# Altium PCB zulu_a7_fab_b.PcbDoc (part 5 of 5)
Units mm, origin at the board's own origin, x right, y up, seen from the top; angles counter-clockwise.
Board outline 69.85 x 25.4 mm, 6 copper layers (Top Layer, L2-GND, L3-SIG, L4-SIG, L5-VCC3V3, Bottom Layer), stack 1.65 mm thick; 203 components, 197 nets, 896 pads, 2025 vias.
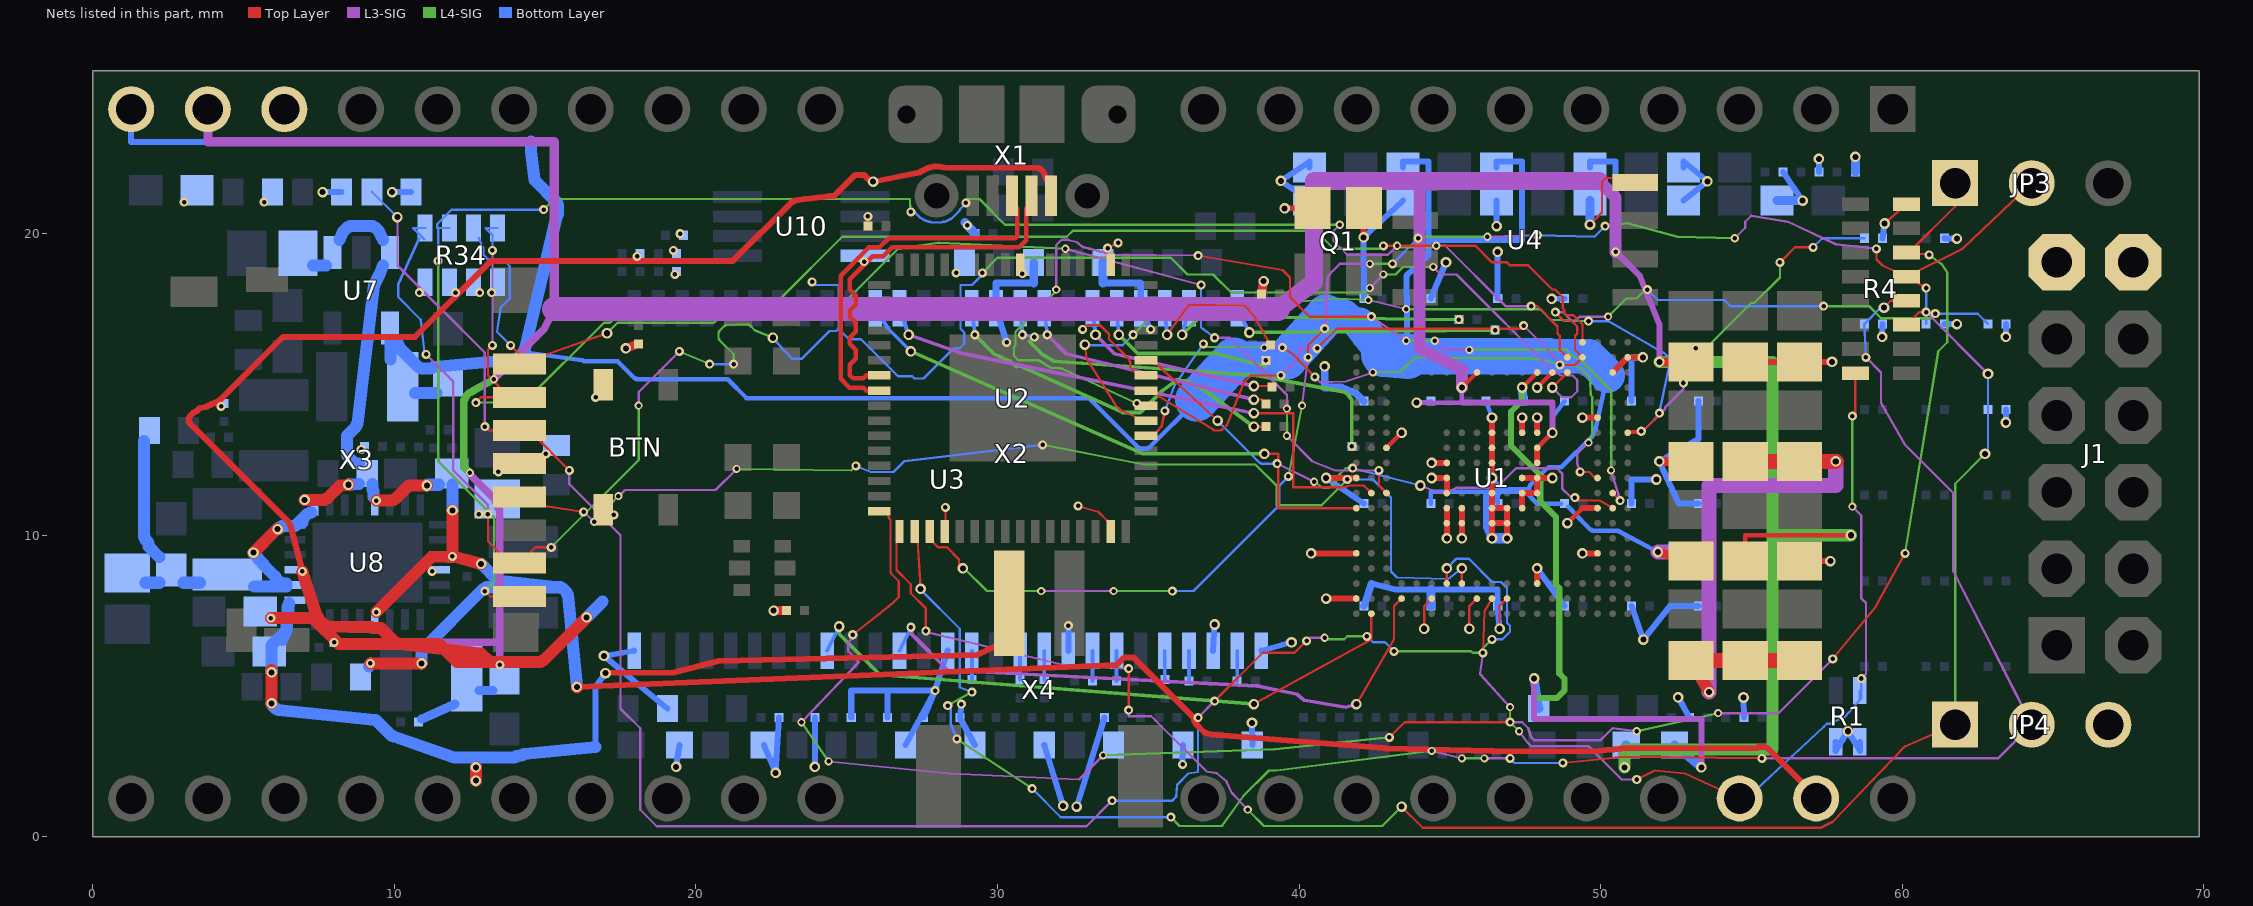
[diagram p8: the nets of this part, all layers, seen from the top]

## Via types
v1: diameter 0.27, hole 0.15, L3-SIG to L4-SIG, tented both sides, 403 vias
v2: diameter 0.3, hole 0.15, Top Layer to L2-GND, tented both sides, 344 vias
v3: diameter 0.3, hole 0.15, L5-VCC3V3 to Bottom Layer, tented both sides, 330 vias
v4: diameter 0.35, hole 0.2, Top Layer to Bottom Layer, tented both sides, 329 vias
v5: diameter 0.3, hole 0.15, L4-SIG to L5-VCC3V3, tented both sides, 312 vias
v6: diameter 0.3, hole 0.15, L2-GND to L3-SIG, tented both sides, 307 vias

## Nets (pads, with @x,y where several pads share a name; then routed paths per layer and width w, separated by ;. In a path a pad name is that pad's centre, name@x,y a point inside that pad or via, vN(x,y) a via of type N, cw(c..) or ccw(c..) an arc to the next point about the centre after c; other vN are vias at no path point) (continued)
RST#: R1.2 R4.16 U1.V10 X2.23 | length 29.3
  Top Layer w0.076: v2(46.1,6.1) 46.15,7.475 U1.V10@46.4,7.9 ; v2(51.2,1.9) 51.8,2.2 52.8,2.1 X2.23@54.61,1.27 ; v2(58.35,13.95) 58.45,14.05 R4.16@58.45,15.378
  L3-SIG w0.076: v2(46.1,6.1) 46,5.4 v1(47,4.3) ; v1(47.3,3.5) 47.6,3.1 47.7,3 49.6,3 50.7,1.9 v2(51.2,1.9) ; v1(58.35,10.95) 58.65,10.65 58.65,7.9 58.8,7.75 58.8,5.4 v1(58.65,5.25)
  L4-SIG w0.076: v1(47,4.3) 47,3.8 v1(47.3,3.5) ; v1(58.35,10.95) v2(58.35,13.95)
  Bottom Layer w0.076: X2.23@55.15,1.55 57.4,3.65 57.5,3.75 57.625,3.75 57.65,3.775 58.1,3.975 R1.2@58.6,4.55 ; R1.2@58.6,4.85 R1.2@58.6,4.55 ; v1(58.65,5.25) 58.65,4.6 R1.2@58.6,4.55
  other v1: 58.35,13.95
  other v3: 58.65,5.25
  other v5: 58.65,5.25
  other v6: 51.2,1.9 46.1,6.1 58.35,13.95
SD-CLK: U1.U8 X3.5 | length 36.5
  Top Layer w0.076: X3.5@14.825,11 v2(16.275,10.775) ; U1.U8@45.4,8.4 v4(45.4,8.9)
  L3-SIG w0.076: v2(16.275,10.775) v1(16.625,10.45) ; v1(17.425,11.3) 17.45,11.3 17.65,11.5 20.65,11.5 v1(21.35,12.2)
  L4-SIG w0.076: v1(16.625,10.45) v1(17.425,11.3) ; v1(21.35,12.2) 25.15,12.15 v5(25.3,12.3) ; v5(31.5,13) 34.85,12.35 38.55,12.35 39.25,11.65 39.25,11 40.75,11 v5(41.6,11.85)
  Bottom Layer w0.076: v5(25.3,12.3) 25.8,12.1 26.55,12.1 26.9,12.45 v5(31.5,13) ; v5(41.6,11.85) 42.45,11.85 43.05,11.25 43.05,8.8 43.25,8.6 44.95,8.55 v4(45.4,8.9)
  other v3: 41.6,11.85 25.3,12.3 31.5,13
  other v6: 16.275,10.775
SD-CMD: R35.1 U1.U7 X3.3 | length 63
  Top Layer w0.076: v2(13,13.6) 13.125,13.475 X3.3@14.15,13.475 14.475,13.475 v2(15.8,12.15) ; v2(37.2,4.5) 38.8,6.1 39.85,6.1 v2(40.25,6.5) ; U1.U7@44.9,8.4 v4(44.9,8.9)
  L3-SIG w0.076: v4(10.1,20.55) 10.1,18.95 13,16.05 v2(13,13.6) ; v2(15.8,12.15) 15.8,11.7 17.5,10 17.5,4.25 18.15,3.6 18.15,0.9 18.7,0.35 32.95,0.35 v1(33.8,1.2) ; v1(36.65,3.95) v2(37.2,4.5) ; v2(40.25,6.5) 40.35,6.6 v1(40.85,6.6)
  L4-SIG w0.076: v1(40.85,6.6) 40.9,6.55 41.5,6.55 41.6,6.65 v5(42.25,6.65) ; v5(43.15,6.15) 45.7,6.15 45.75,6.1 45.95,6.1 v5(46.4,6.55)
  Bottom Layer w0.076: R35.1@9.25,21.39 v4(10.1,20.55) ; v1(33.8,1.2) 35.8,1.2 35.932,1.332 35.95,1.72 36.327,2.097 36.65,2.152 v1(36.65,3.95) ; v5(42.25,6.65) 42.45,6.45 42.85,6.45 v5(43.15,6.15) ; v4(44.9,8.9) 45.225,9.225 45.625,9.225 46.4,8.45 46.7,8.45 46.9,8.25 46.9,7.1 47,7 47,6.8 46.75,6.55 v5(46.4,6.55)
  other v3: 33.8,1.2 36.65,3.95 43.15,6.15 46.4,6.55 42.25,6.65
  other v5: 33.8,1.2 36.65,3.95
  other v6: 37.2,4.5 40.25,6.5 15.8,12.15 13,13.6
SD-DAT0: R34.1 U1.C15 X3.7 | length 66.4
  Top Layer w0.076: v2(13.1,10.7) 13.1,9.8 13.825,9.075 X3.7@14.15,9.075 14.675,9.6 v2(15.2,9.6) ; v4(48.4,14.9) U1.C15@48.9,15.4
  L3-SIG w0.076: v1(11.05,16) 11.95,15.1 11.95,12.15 13.1,11 v2(13.1,10.7) ; v1(18.1,14.3) 18.1,14.75 v6(19.45,16.1) ; v1(42.35,18.2) v1(42.8,18.65) ; v1(44.45,18.9) 44.7,18.65 45.225,18.65 48.5,15.375 48.6,15.375 48.675,15.3 49.075,15.3 49.225,15.15 49.225,14.775 49.025,14.575 48.725,14.575 v4(48.4,14.9)
  L4-SIG w0.076: v2(15.2,9.6) 18.1,12.5 v1(18.1,14.3) ; v6(19.45,16.1) v5(20.45,15.675) ; v5(21.25,15.675) 21.25,16 20.775,16.475 20.775,16.5 20.75,16.525 20.75,16.725 20.775,16.75 20.775,16.775 20.95,16.95 20.975,16.95 21,16.975 21.725,17 21.75,16.975 21.775,16.975 21.95,16.8 v4(22.55,16.55) ; v5(29.5,18.7) 30,19.2 35.75,19.2 36.3,18.65 37.15,18.65 37.75,18.05 42.2,18.05 v1(42.35,18.2) ; v1(42.8,18.65) 43.2,18.65 43.45,18.9 v1(44.45,18.9)
  Bottom Layer w0.076: R34.1@10.825,19.85 10.125,18.325 10.125,17.9 10.875,17.15 11,16.05 v1(11.05,16) ; R34.1@11,19.81 10.62,20.19 R34.1@11.02,20.19 ; v5(20.45,15.675) v5(21.25,15.675) ; v4(22.55,16.55) 22.925,16.125 23.2,15.85 23.5,15.85 24.425,16.775 24.65,16.775 24.725,16.85 ; v3(23.85,18.4) 23.95,18.3 24.725,18.3 24.725,16.85 ; v5(29.5,18.7) 29.5,18.65 29.15,18.3 28.775,18.3 28.775,16.85 28.9,16.725 28.9,16.35 28.75,16.2 28.575,16.2 28.55,16.175 28.525,16.175 27.55,15.2 27.25,15.2 27.175,15.275 26.7,15.275 25.475,16.5 25.075,16.5 24.725,16.85
  other v1: 15.2,9.6 19.45,16.1
  other v3: 20.45,15.675 21.25,15.675 11.05,16 29.5,18.7
  other v5: 11.05,16
  other v6: 15.2,9.6 13.1,10.7
SD-DAT1: R34.2 U1.B15 X3.8 | length 57
  Top Layer w0.076: v2(13,8.15) 13.175,7.975 X3.8@14.15,7.975 ; v2(47.7,17.6) 47.9,17.6 48.575,16.925 48.575,16.688 48.65,16.612 48.65,16.15 U1.B15@48.9,15.9
  L3-SIG w0.076: v1(41.35,20.3) 41.15,20.1 41.15,19.75 41.6,19.3 42.95,19.3 v1(43.25,19.6) ; v1(44.55,19.6) 44.85,19.6 46.85,17.6 v2(47.7,17.6)
  L4-SIG w0.076: v5(11.45,19.1) 11.45,12.45 13.3,10.6 13.3,8.45 v2(13,8.15) ; v5(14.95,20.8) 15.3,21.15 27.1,21.15 27.1,21.05 v5(27.125,20.725) ; v5(28.95,21.025) 28.95,21.15 29.4,21.15 30.25,20.3 v1(41.35,20.3) ; v1(43.25,19.6) 43.3,19.55 44.5,19.55 v1(44.55,19.6)
  Bottom Layer w0.076: v5(11.45,19.1) 11.45,20.16 11.42,20.19 ; R34.2@11.82,20.19 11.42,20.19 ; v5(14.95,20.8) 11.9,20.8 11.42,20.32 11.42,20.19 ; v5(27.125,20.725) 27.25,20.725 27.45,20.525 27.475,20.525 27.525,20.475 27.55,20.475 27.575,20.45 27.6,20.45 27.625,20.425 27.675,20.425 27.7,20.4 27.775,20.4 27.8,20.375 28.15,20.375 28.175,20.4 28.275,20.4 28.3,20.425 28.325,20.425 28.35,20.45 28.375,20.45 28.4,20.475 28.425,20.475 28.45,20.5 28.475,20.5 28.75,20.775 28.75,20.8 28.775,20.825 v5(28.95,21.025)
  other v1: 13,8.15
  other v3: 11.45,19.1 27.125,20.725 14.95,20.8 28.95,21.025
  other v6: 13,8.15 47.7,17.6
SD-DAT2: R34.3 U1.L3 X3.1 | length 40.2
  Top Layer w0.076: v2(13.85,16.3) 14.15,16 X3.1@14.15,15.675 v4(17.05,16.7) ; v2(42.65,12.15) 42.65,11.65 U1.L3@42.9,11.4
  L3-SIG w0.076: v1(32.25,19.5) v1(36.75,18.3) ; v1(37.2,16.55) 37.7,16.55 39.6,14.65 v1(39.6,14.2) ; v1(39.6,13.3) 40.45,12.45 41.2,12.15 v2(42.65,12.15)
  L4-SIG w0.076: v4(17.05,16.7) 17.4,17.05 20.6,17.05 20.95,17.4 24.6,17.4 26.7,19.5 28.05,19.7 v1(32.25,19.5) ; v1(39.6,13.3) v1(39.6,14.2)
  Bottom Layer w0.076: R34.3@12.8,19.85 12.925,19.55 12.95,19.525 12.95,19.3 13.1,19.15 13.6,19.15 13.825,18.925 13.825,17.85 13.525,17.55 13.4,16.75 v2(13.85,16.3) ; v1(36.75,18.3) 36.75,16.9 36.8,16.85 v1(37.2,16.55)
  other v1: 13.85,16.3
  other v3: 13.85,16.3 37.2,16.55 36.75,18.3
  other v5: 13.85,16.3 37.2,16.55 36.75,18.3
  other v6: 42.65,12.15 13.85,16.3
SD-DAT3: R34.4 U1.A16 X3.2 | length 49.3
  Top Layer w0.076: v2(12.7,14.4) 12.875,14.575 X3.2@13.825,14.575 ; v2(13.25,16.3) 13.1,16.15 13.1,15.3 X3.2@13.825,14.575 ; X3.2@14.15,14.575 X3.2@13.825,14.575 ; v2(42.8,19.6) 45.85,19.6 46.4,19.05 46.9,19.05 47,18.95 47.6,18.95 48.4,18.15 48.5,18.15 48.75,17.9 48.75,17.525 48.8,17.475 48.8,17.375 48.875,17.3 49.1,17.3 49.4,17 U1.A16@49.4,16.4
  L3-SIG w0.076: v2(13.25,16.3) v1(13.25,19.45)
  L4-SIG w0.076: v2(12.7,14.4) 14.3,14.4 16.95,17.05 17.15,17.05 17.4,17.3 20.1,17.3 20.65,17.85 22.8,17.85 24.85,19.9 32.3,19.9 32.5,20.1 40.55,20.1 41.15,19.5 42.7,19.5 v2(42.8,19.6)
  Bottom Layer w0.076: v1(13.25,19.45) 13.25,19.96 13.02,20.19 R34.4@13.42,20.19
  other v1: 12.7,14.4 42.8,19.6
  other v3: 13.25,19.45
  other v5: 13.25,19.45
  other v6: 12.7,14.4 13.25,16.3 42.8,19.6
SDRAM-CLK: U1.M1 U3.38 | length 19.2
  Top Layer w0.076: v4(38.85,12.7) 39.312,12.7 39.312,10.9 40.9,10.9 41.5,10.9 U1.M1@41.9,10.9
  L4-SIG w0.125: v4(27.125,16.1) 34.825,12.7 v4(38.85,12.7)
  Bottom Layer w0.125: U3.38@25.95,17.53 26.375,16.85 v4(27.125,16.1)
SDRAM-CS#: U1.W2 U3.19 | length 20.8
  Top Layer w0.076: v4(38.5,4.4) 42.4,6.55 U1.W2@42.4,7.4
  L4-SIG w0.125: v4(24.75,6.975) 24.75,6.725 26.1,5.375 v4(38.5,4.4)
  Bottom Layer w0.125: U3.19@24.35,6.17 v4(24.75,6.975)
SDRAM-D0: R119.1 U3.2 | length 1
  Bottom Layer w0.125: R119.1@37.95,5.17 U3.2@37.95,6.17
SDRAM-D1: R120.1 U3.4 | length 1
  Bottom Layer w0.125: R120.1@36.35,5.17 U3.4@36.35,6.17
SDRAM-D2: R121.1 U3.5 | length 1
  Bottom Layer w0.125: R121.1@35.55,5.21 U3.5@35.55,6.17
SDRAM-D3: R122.1 U3.7 | length 1
  Bottom Layer w0.125: R122.1@33.95,5.17 U3.7@33.95,6.17
SDRAM-D4: R123.1 U3.8 | length 1
  Bottom Layer w0.125: R123.1@33.15,5.17 U3.8@33.15,6.17
SDRAM-D5: R124.1 U3.10 | length 1
  Bottom Layer w0.125: R124.1@31.55,5.21 U3.10@31.55,6.17
SDRAM-D6: R125.1 U3.11 | length 1
  Bottom Layer w0.125: R125.1@30.75,5.21 U3.11@30.75,6.17
SDRAM-D7: R126.1 U3.13 | length 1
  Bottom Layer w0.125: R126.1@29.15,5.21 U3.13@29.15,6.17
SDRAM-D8: R127.1 U3.42 | length 12.2
  Top Layer w0.076: v4(38.5,13.6) R127.1@38.9,13.6
  L4-SIG w0.12: 30.625,15.6 30.825,15.6 30.85,15.575
  L4-SIG w0.125: v3(29.25,16.65) 29.875,16.025 30.4,15.775 30.425,15.775 30.575,15.625 30.6,15.625 30.625,15.6 ; 30.85,15.575 34.15,14.075 34.725,14.075 34.75,14.1 34.775,14.1 35.475,14.8 35.95,15.15 36.225,15.125 36.25,15.1 36.3,15.1 36.35,15.075 36.375,15.05 36.4,15.05 36.45,15.025 36.475,15 36.5,15 36.55,14.975 36.575,14.95 36.6,14.95 36.65,14.925 36.675,14.9 36.7,14.9 36.725,14.875 36.75,14.875 36.775,14.85 36.8,14.85 36.85,14.825 v4(38.5,13.6)
  Bottom Layer w0.125: U3.42@29.15,17.53 v3(29.25,16.65)
  other v5: 29.25,16.65
SDRAM-D9: R128.1 U3.44 | length 14.2
  L4-SIG w0.125: v3(31.225,16.575) 31.05,16.425 31.45,16.025 31.875,15.775 38.6,15.3 41.5,14.75 41.6,14.7 41.75,14.5 41.75,13.275 v3(41.75,12.95)
  Bottom Layer w0.125: U3.44@30.75,17.53 v3(30.825,16.65) v3(31.225,16.575)
  other v5: 41.75,12.95 31.225,16.575
SDRAM-D10: R129.1 U3.45 | length 8.6
  Top Layer w0.076: v4(38.5,14.5) 38.77,14.5 R129.1@38.91,14.36
  L3-SIG w0.125: v3(31.65,16.65) 32.275,16.025 v4(38.5,14.5)
  Bottom Layer w0.125: U3.45@31.55,17.53 v3(31.65,16.65)
  other v1: 31.65,16.65
  other v5: 31.65,16.65
SDRAM-D11: R130.1 U3.47 | length 7.1
  Top Layer w0.076: v4(38.5,14.95) 39.1,14.95 R130.1@39.1,14.92
  L3-SIG w0.125: v4(33.25,16.65) 33.875,16.025 v4(38.5,14.95)
  Bottom Layer w0.125: U3.47@33.15,17.53 v4(33.25,16.65)
SDRAM-D12: R131.1 U3.48 | length 6.2
  L4-SIG w0.125: v4(34.025,16.65) 34.65,16.025 37.25,16.025 38.854,15.619 v1(38.9,15.8)
  Bottom Layer w0.125: U3.48@33.95,17.53 v4(34.025,16.65)
  other v2: 38.9,15.8
  other v6: 38.9,15.8
SDRAM-D13: R132.1 U3.50 | length 5.5
  Top Layer w0.076: v4(35.625,16.65) 36.345,17.64 38.185,17.62 38.505,17.28 R132.1@39.05,16.304
  Bottom Layer w0.125: U3.50@35.55,17.53 v4(35.625,16.65)
SDRAM-D14: R133.1 U3.51 | length 10.3
  L4-SIG w0.125: v4(36.125,16.65) 36.725,17.25 38,17.25 v5(45.3,17.15)
  Bottom Layer w0.125: v4(36.125,16.65) U3.51@36.35,17.53
  other v3: 45.3,17.15
SDRAM-D15: R134.1 U3.53 | length 9
  L4-SIG w0.125: v4(38.35,16.725) v5(46.5,16.8)
  Bottom Layer w0.125: U3.53@37.95,17.53 v4(38.35,16.725)
  other v3: 46.5,16.8
TCK: JP3.1 R4.6 U2.16 | length 63.9
  Top Layer w0.076: v2(25.2,6.7) 26.1,7.4 26.55,7.775 26.725,7.95 26.725,8.475 26.475,8.725 26.475,8.75 26.45,8.775 26.45,10.5 26.425,10.525 U2.16@26.35,10.7 ; v2(43,3.3) 43.5,3.8 v2(47,3.8) ; v2(57.7,5.9) 59.1,7.6 v2(60.1,9.4) ; v2(60.9,19.3) R4.6@60.15,19.378 60.228,19.378 61.76,20.91 JP3.1@61.76,21.68
  L3-SIG w0.076: v1(23.5,3.8) 25.405,5.796 25.4,5.8 25.05,6.15 25.05,6.45 25.2,6.6 v2(25.2,6.7) ; v1(24.4,2.5) 28.4,2.1 32.7,1.9 v1(33.5,2.7) ; v2(47,3.8) 47.4,3.8 47.6,3.6 47.7,3.3 47.8,3.2 50,3.2 50.4,3.6 v1(51.2,3.5) ; v1(53.9,4.1) 55.9,4.1 v2(57.7,5.9)
  L4-SIG w0.076: v1(23.5,3.8) v1(24.4,2.5) ; v1(33.5,2.7) 39.2,2.9 v2(43,3.3) ; v1(51.2,3.5) v1(53.9,4.1) ; v2(60.1,9.4) 61.2,16.1 61.5,16.4 61.5,18.7 61.3,19 v2(60.9,19.3)
  other v1: 43,3.3 60.1,9.4 60.9,19.3
  other v6: 43,3.3 47,3.8 57.7,5.9 25.2,6.7 60.1,9.4 60.9,19.3
TDI: JP4.1 R4.3 R90.1 U2.17 | length 58.5
  Top Layer w0.076: U2.17@26.65,9.825 26.65,8.85 27.125,8.375 27.125,8.075 27.625,7.575 v6(27.625,6.825) ; v2(34.35,4.2) v2(34.35,5.575) ; v4(43.4,1) 44.1,0.3 57.3,0.3 57.7,0.5 60.1,3 JP4.1@61.76,3.72 ; R4.3@60.15,16.978 60.572,17.4 v2(60.8,17.4)
  L3-SIG w0.076: v6@27.6,6.8 32.2,5.7 v2(34.35,5.575) ; v6@27.625,6.8 v6(27.625,6.825) ; v2(34.35,4.2) 34.35,4 35.1,4 36.936,2.164 37.276,2.109 37.599,1.828 37.759,1.468 v1(38.3,0.9) ; v2(60.8,17.4) v4(62.85,15.35)
  L4-SIG w0.076: v1(38.3,0.9) 38.84,0.36 42.76,0.36 v4(43.4,1) ; JP4.1@61.76,3.72 61.76,11.71 v4(62.75,12.7)
  Bottom Layer w0.076: v4(62.75,12.7) 62.85,12.8 R90.1@62.85,14.17 v4(62.85,15.35)
  other v2: 27.625,6.825
  other v6: 34.35,4.2 34.35,5.575 60.8,17.4
TDO: JP4.2 R4.4 R91.1 U2.18 | length 62.9
  Top Layer w0.076: U2.18@27.35,9.825 v4(27.45,8.225) ; v2(48.75,2.45) 50.8,2.65 v2(55.35,2.6) ; v4(59.4,17.55) 59.628,17.778 R4.4@60.15,17.778
  L3-SIG w0.076: v1(44.4,2.85) v1(45.4,2.6) ; v1(46.15,2.6) v1(47,2.6) ; v2(55.35,2.6) 63.18,2.6 JP4.2@64.3,3.72 61.7,8.8 61.7,11.4 60.1,13 59.3,14.4 59.3,15.4 v1(58.8,15.9)
  L4-SIG w0.076: v5(28.35,4.35) v5(29.15,4.8) ; v5(28.65,3.25) v5(31.15,1.6) ; v5(35.75,0.65) 36.04,0.36 37.45,0.36 38.15,1.35 39,2.2 39.25,2.2 v1(44.4,2.85) ; v1(45.4,2.6) v1(46.15,2.6)
  Bottom Layer w0.076: v4@27.3,8.2 v4@27.45,8.2 ; v4(27.45,8.225) v4@27.45,8.2 ; v5(28.35,4.35) 28.45,4.25 28.45,3.75 v5(28.65,3.25) ; v5(29.15,4.8) 28.75,4.95 28.75,5.55 28.75,6.9 v4@27.45,8.2 ; v5(31.15,1.6) 32.1,0.65 v5(35.75,0.65) ; v1(47,2.6) 47.15,2.45 v2(48.75,2.45) ; v1(58.8,15.9) R91.1@58.75,17.01 59.29,17.55 v4(59.4,17.55)
  other v1: 48.75,2.45
  other v3: 35.75,0.65 31.15,1.6 48.75,2.45 47,2.6 28.65,3.25 28.35,4.35 29.15,4.8 58.8,15.9
  other v5: 48.75,2.45 47,2.6 58.8,15.9
  other v6: 48.75,2.45 55.35,2.6
TMS: JP3.2 R4.5 R92.1 U2.19 | length 49.8
  Top Layer w0.076: U2.19@27.85,9.825 27.875,9.75 28.025,9.6 28.325,9.6 28.725,9.2 28.725,9.025 v4(28.85,8.9) ; v2(40.3,15.9) 40.3,16.3 v2(40.85,16.85) ; v2(59.15,19.5) 59.15,19.15 59.35,18.95 R4.5@60.15,18.578 ; v2(60.8,18.2) R4.5@60.15,18.578 ; JP3.2@64.3,21.68 62,19.5 R4.5@60.15,18.578
  L3-SIG w0.076: v1(31.45,8.15) v1(33.85,8.15) ; v1(40.1,14.3) v2(40.3,15.9) ; v2(40.85,16.85) 40.95,18.55 41.1,18.75 41.35,19 v1(42.35,19) ; v1(46.25,19.9) v1(47.9,19.95) ; v1(54.45,19.85) 54.8,20.2 54.8,20.4 55,20.6 56.2,20.4 57.8,19.65 v2(59.15,19.5)
  L4-SIG w0.076: v4(28.85,8.9) v4@28.875,8.925 ; v4@28.85,8.95 29.65,8.15 v1(31.45,8.15) ; v1(33.85,8.15) v5(35.8,8.15) ; v5(39.65,11.95) v1(40.1,14.3) ; v1(42.35,19) v5(43.1,19) ; v5(43.95,19.85) 44,19.9 v1(46.25,19.9) ; v5(50.15,20.25) 50.9,20.35 52.55,19.9 v1(54.45,19.85)
  Bottom Layer w0.076: v5(35.8,8.15) 36.5,8.15 39.35,11 39.35,11.65 v5(39.65,11.95) ; v5(43.1,19) v5(43.95,19.85) ; v1(47.9,19.95) 49.8,19.9 v5(50.15,20.25) ; R92.1@60.8,17.01 v2(60.8,18.2)
  other v1: 60.8,18.2
  other v3: 35.8,8.15 39.65,11.95 60.8,18.2 43.1,19 43.95,19.85 47.9,19.95 50.15,20.25
  other v5: 60.8,18.2 47.9,19.95
  other v6: 40.3,15.9 40.85,16.85 60.8,18.2 59.15,19.5
UART_FT_CTS#: R93.1 U1.B16 U2.41 | length 34.9
  Top Layer w0.076: U2.41@35.2,14.7 37.15,13.5 37.175,13.5 37.2,13.475 37.4,13.475 37.425,13.5 37.45,13.5 37.6,13.65 37.6,13.675 37.625,13.7 38.175,15.075 38.4,15.3 v2(39.4,15.3) ; v2(40.6,16.2) 41.25,16.85 47.35,16.85 v2(47.45,16.95) ; v2(48.5,17.4) 48.775,17.125 49.025,17.125 49.1,17.05 49.225,16.925 49.225,16.687 49.15,16.612 49.15,16.15 U1.B16@49.4,15.9 49.15,15.65 v2(48.65,15.65)
  L3-SIG w0.076: v2(39.4,15.3) 40,15.9 40,16.2 v2(40.6,16.2) ; v2(47.45,16.95) 48.65,15.75 v2(48.65,15.65) ; v2(48.5,17.4) 48.75,17.4 49.1,17.05 49.3,17.25 v1(50.25,17.25)
  L4-SIG w0.076: v1(50.25,17.25) 50.85,17.85 51.2,17.85 51.5,18.15 v5(51.55,18.15) ; v5(57.4,17.6) 58.9,17.6 59.3,17.2 60.95,17.2 v5(61.1,17.35)
  Bottom Layer w0.076: v5(51.55,18.15) 51.9,17.8 54.1,17.8 54.3,17.6 v5(57.4,17.6) ; v5(61.1,17.35) 62.51,17.35 R93.1@62.85,17.01
  other v3: 61.1,17.35 57.4,17.6 51.55,18.15
  other v6: 39.4,15.3 48.65,15.65 40.6,16.2 47.45,16.95 48.5,17.4
UART_FT_DTR#: U1.M18 U2.43 | length 18.3
  Top Layer w0.076: U2.43@35.2,15.7 35.275,15.675 v4(37.3,13.8) ; v2(49.15,11.25) 49.25,11.15 49.975,11.15 U1.M18@50.4,10.9
  L3-SIG w0.076: v3(39.275,12.375) v1(40.5,11.775) ; v4(44.025,11.65) 44.65,11.4 44.875,11.4 45.225,11.575 46.55,11.575 47.2,12.225 48.55,12.225 48.725,12.05 48.725,11.55 49.025,11.25 v2(49.15,11.25)
  L4-SIG w0.076: v1(40.5,11.775) 40.75,11.6 40.775,11.6 40.8,11.575 41,11.575 41.025,11.6 41.05,11.6 41.2,11.75 41.225,11.8 41.225,11.9 41.55,12.225 v3(41.775,12.225)
  Bottom Layer w0.076: v4(37.3,13.8) 38.7,12.4 38.725,12.4 38.75,12.375 v3(39.275,12.375) ; v3(41.775,12.225) v4(44.025,11.65)
  other v1: 49.15,11.25 39.275,12.375
  other v5: 41.775,12.225 39.275,12.375
  other v6: 49.15,11.25
UART_FT_RTS#: U1.L18 U2.40 | length 33.4
  Top Layer w0.076: v6(36.65,19.275) 39.45,18.8 39.7,18.55 39.7,17.9 40.35,17.25 v2(42.4,17.25) ; U1.L18@50.4,11.4 v2(50.65,11.15)
  L3-SIG w0.076: v1(31.95,18.15) 31.95,19.6 31.975,19.65 32.1,19.775 32.15,19.8 32.35,19.8 32.4,19.775 32.625,19.725 32.8,19.575 32.825,19.55 32.9,19.55 32.925,19.525 33,19.525 33.025,19.5 33.1,19.5 33.125,19.475 33.175,19.475 33.2,19.45 33.275,19.45 33.3,19.425 33.375,19.425 33.4,19.4 33.475,19.4 33.5,19.375 33.55,19.375 33.575,19.35 33.65,19.35 33.675,19.325 33.75,19.325 33.775,19.3 33.85,19.3 v6(36.65,19.275) ; v2(42.4,17.25) v1(43.55,16.45) ; v1(44.5,16.45) 44.75,16.2 44.85,16.15 v1(45.65,16.15) ; v1(50.35,12.15) v2(50.65,11.15)
  L4-SIG w0.076: v1(31.95,18.15) 31.95,18.1 30.6,16.75 30.6,16.3 30.55,16.25 30.55,15.95 30.7,15.8 31.375,15.8 31.4,15.775 31.425,15.775 31.475,15.725 31.5,15.725 31.525,15.7 31.55,15.7 31.6,15.65 31.65,15.625 31.7,15.6 31.725,15.6 31.775,15.55 32.075,15.55 32.1,15.525 32.175,15.525 32.2,15.5 v6(34.625,14.375) ; v1(43.55,16.45) v1(44.5,16.45) ; v1(45.65,16.15) 48.85,16.15 48.95,16.05 49.4,15.75 50.35,14.8 v1(50.35,12.15)
  other v1: 34.625,14.375
  other v2: 34.625,14.375 36.65,19.275
  other v6: 50.65,11.15 42.4,17.25
UART_FT_RXD: R94.1 U1.G19 U2.39 | length 38.2
  Top Layer w0.076: v4(32.9,16.325) 32.95,15.875 33.925,14.3 34.075,14.15 34.1,14.15 34.125,14.125 U2.39@34.625,13.9 ; v2(51.35,13.45) 50.95,13.45 U1.G19@50.9,13.4 51.35,13.4 51.65,13.7 v2(51.95,14.05) ; v2(55.95,19.05) 56.45,19.55 v2(57.05,19.55)
  L3-SIG w0.076: v1(42.3,17.8) v1(43.55,17.5) ; v2(51.35,13.45) 51.4,13.45 52.15,14.2 52.15,14.25 52.75,14.85 v1(52.75,15.05)
  L4-SIG w0.076: v5(34.5,16.65) 35.35,17.5 36.75,17.5 41.3,17.85 v1(42.3,17.8) ; v1(43.55,17.5) 48,17.5 48.35,17.15 v5(49.6,17.1) ; v5(53.15,16.2) 53.5,16.2 55,17.7 55.1,17.7 55.95,18.55 v2(55.95,19.05)
  Bottom Layer w0.076: v4(32.9,16.325) 32.9,16.3 34.15,16.3 v5(34.5,16.65) ; v5(49.6,17.1) 50.25,17.1 52.1,16.05 52.3,15.85 52.3,15.75 v2(51.95,14.05) ; v1(52.75,15.05) 53.15,15.45 v5(53.15,16.2) ; v2(57.05,19.55) 57.35,19.85 R94.1@58.75,19.85
  other v1: 51.95,14.05 55.95,19.05 57.05,19.55
  other v3: 51.95,14.05 52.75,15.05 53.15,16.2 34.5,16.65 49.6,17.1 57.05,19.55
  other v5: 51.95,14.05 52.75,15.05 57.05,19.55
  other v6: 51.35,13.45 51.95,14.05 55.95,19.05 57.05,19.55
UART_FT_TXD: U1.K17 U2.38 | length 21.1
  Top Layer w0.076: U2.38@35.2,13.4 35.275,13.425 35.45,13.625 v5(35.55,14.125) ; v2(39.45,16.225) 39.775,16.025 v2(40.525,15.25) ; v2(49.325,12.1) 49.625,12.1 49.8,11.925 U1.K17@49.825,11.925
  L3-SIG w0.076: v1(38.85,16.225) v2(39.45,16.225) ; v2(40.525,15.25) 40.7,15.075 41.55,15.1 v1(42.45,15.4) ; v2(49.325,12.1) 49.225,12.375 49.225,12.7 v1(49.6,13.075)
  L4-SIG w0.076: v5(36.825,16.35) 36.925,16.25 v1(38.85,16.225) ; v1(42.45,15.4) 43.35,15.425 43.85,15.9 45.75,15.875 47.65,15.875 49.225,15.6 49.325,15.55 49.65,15.225 49.675,14.65 49.725,14.575 49.725,13.35 v1(49.6,13.075)
  Bottom Layer w0.076: v5(35.55,14.125) 35.875,14.975 v5(36.825,16.35)
  other v1: 35.55,14.125
  other v2: 35.55,14.125
  other v3: 35.55,14.125 36.825,16.35
  other v6: 49.325,12.1 35.55,14.125 40.525,15.25 39.45,16.225
UDQM: U1.L2 U3.39 | length 19.2
  Top Layer w0.076: v4(38.5,14.05) 39.812,14.05 39.812,11.59 40.9,11.59 41.5,11.59 41.688,11.65 42.15,11.65 U1.L2@42.4,11.4
  L3-SIG w0.125: v4(27.05,16.65) 28.85,16.025 v4(38.5,14.05)
  Bottom Layer w0.125: U3.39@26.75,17.53 v4(27.05,16.65)
USB5V0: C150.2 U8.25 X1.1 | length 63.5
  Top Layer w0.2: v2(6.95,8.8) 6.55,10.325 6.525,10.35 6.525,10.375 6.5,10.4 6.5,10.425 3.2,13.725 3.2,13.75 3.175,13.775 3.175,13.875 3.2,13.9 3.2,13.925 3.35,14.075 3.4,14.1 3.425,14.1 3.525,14.2 3.55,14.2 3.575,14.225 3.725,14.25 3.75,14.25 3.775,14.275 3.8,14.275 3.825,14.3 3.85,14.3 3.875,14.325 3.9,14.325 3.925,14.35 4,14.375 4.025,14.375 4.05,14.4 4.075,14.4 4.1,14.425 4.125,14.425 4.15,14.45 4.175,14.45 6.3,16.575 10.675,16.575 13.175,19.075 13.2,19.075 13.225,19.1 21.225,19.1 23.175,21.05 23.2,21.05 23.225,21.075 23.25,21.075 23.275,21.1 23.4,21.125 23.6,21.15 23.8,21.175 24.025,21.2 24.225,21.225 24.425,21.25 24.575,21.25 25.25,21.925 25.3,21.95 25.55,21.95 25.6,21.925 25.8,21.725 v4(25.875,21.725) 27.4,22.025 27.425,22.025 27.475,22.075 27.5,22.075 27.525,22.1 27.55,22.1 27.575,22.125 27.6,22.125 27.625,22.15 27.65,22.15 27.675,22.175 27.75,22.2 27.9,22.225 28.05,22.225 28.225,22.2 31.375,22.175 31.4,22.15 31.425,22.15 31.525,22.05 31.55,22 X1.1@31.625,21.775
  Top Layer w0.4: v2(5.9,7.25) 7.25,7.25 7.3,7.225 7.325,7.2 7.35,7.2 8.15,6.4 11.475,6.4 12.075,5.8 14.85,5.8 ; v2(6.95,8.8) 7.425,7.325 7.45,7.3 7.45,7.275 7.475,7.25 7.475,7.225 7.675,7.025 7.7,7.025 7.725,7 7.75,7 7.775,6.975 9.2,6.95 9.225,6.95 9.25,6.925 9.55,6.925 10.025,6.45 10.05,6.45 10.075,6.425 10.1,6.425 10.125,6.4 12.875,6.075 13.1,5.85 13.125,5.85 13.15,5.825 13.2,5.8 14.85,5.8 ; 14.85,5.8 14.9,5.825 ; 14.85,5.8 14.9,5.825 ; 14.9,5.825 14.925,5.85 ; 14.9,5.825 14.925,5.85 ; 14.925,5.85 14.95,5.85 ; 14.925,5.85 14.95,5.85 ; 14.95,5.85 v4(16.375,7.275) 14.95,5.85
  Bottom Layer w0.4: v4(16.375,7.275) 16.9,7.8 v4(16.375,7.275)
  other v1: 5.9,7.25 6.95,8.8
  other v3: 5.9,7.25 6.95,8.8
  other v5: 5.9,7.25 6.95,8.8
  other v6: 5.9,7.25 6.95,8.8
USB_D_N: U2.7 X1.2 | length 12.2
  Top Layer w0.15: U2.7@26.075,15.3 25.65,15.3 25.55,15.2 25.212,15.2 25.1,15.312 25.1,15.65 25.3,15.85 25.3,16.15 25.1,16.35 25.1,16.55 25.3,16.75 25.3,17.05 25.1,17.25 25.1,17.45 25.3,17.65 25.3,17.95 25.1,18.15 25.1,18.488 25.862,19.25 26.212,19.25 26.512,19.55 30.712,19.55 30.95,19.788 X1.2@30.95,20.85
USB_D_P: U2.8 X1.3 | length 12.2
  Top Layer w0.15: U2.8@26.075,14.8 25.65,14.8 25.55,14.9 25.088,14.9 24.8,15.188 24.8,18.612 25.738,19.55 26.088,19.55 26.388,19.85 30.588,19.85 30.65,19.912 X1.3@30.65,20.85
VBATT: C151.2 U8.23 X4.1 | length 32.8
  Top Layer w0.2: v4(17,5.425) 19.275,5.45 20.75,5.825 29.3,6.025 X4.1@30,6.35
  Top Layer w0.4: v4(5.925,4.425) 5.925,5.525 v4(5.925,5.45) ; v4(12.7,1.86) v4(12.7,2.3)
  Bottom Layer w0.2: 16.675,2.975 16.675,4.975 v4(17,5.425)
  Bottom Layer w0.4: v4(5.925,4.425) 5.925,4.4 5.95,4.375 5.95,4.35 6.05,4.25 6.075,4.25 6.1,4.225 6.125,4.225 6.15,4.2 9.35,3.875 9.375,3.875 9.875,3.375 9.925,3.35 9.95,3.35 9.975,3.325 12,2.625 13.975,2.625 14,2.65 14.025,2.65 14.05,2.675 14.075,2.675 14.225,2.7 14.25,2.725 14.275,2.725 14.3,2.75 14.325,2.75 16.675,2.975 ; v4(5.925,5.45) 5.925,5.525 5.925,6.35 6.375,6.8 6.4,6.85 6.4,6.875 6.425,6.9 6.45,7.6 6.45,7.625 6.475,7.65 6.5,7.7 6.5,7.75 6.425,6.85 C151.2@6.275,6.525 ; v4(12.7,1.86) v4(12.7,2.3)
VCC1V0: C84.2 C85.1 C86.1 C87.1 C88.1 C89.1 C90.1 C91.1 C92.1 C140.1 C141.1 C142.1 C143.1 L3.2 U1.G10 U1.H10 U1.J10 U1.L10 U1.M10 U1.M11 U1.N10 U1.N11 U7.4 X2.20 | length 130.3
  Top Layer w0.2: v4(46.4,9.9) U1.N10@46.4,10.4 ; v4(46.4,13.9) U1.G10@46.4,13.4 U1.H10@46.4,12.9 U1.J10@46.4,12.4 v4(46.4,11.9) U1.L10@46.4,11.4 U1.M10@46.4,10.9 ; v4(46.9,9.9) U1.N11@46.9,10.4 ; U1.N10@46.4,10.4 U1.N11@46.9,10.4 ; U1.N10@46.4,10.4 U1.M10@46.4,10.9 ; U1.M10@46.4,10.9 U1.M11@46.9,10.9 U1.N11@46.9,10.4
  Top Layer w0.3: v4(51.9,9.445) C143.1@53,9.15
  Top Layer w0.4: C140.1@53,5.85 v4(53.6,4.8)
  Top Layer w0.5: C140.1@53,5.85 C141.1@54.8,5.85 C142.1@56.6,5.85 ; C85.1@54.8,12.45 C86.1@56.6,12.45 v4(57.8,12.45)
  L3-SIG w0.5: v4(51.9,9.445) 53.6,9.445 ; v4(53.6,4.8) 53.6,9.445 ; v4(57.8,12.45) 57.8,11.65 53.6,11.65 53.6,9.445
  Bottom Layer w0.15: 14.3,16.075 16.225,15.8 16.25,15.8 16.275,15.775 17.4,15.775 17.975,15.2 18,15.2 18.025,15.175 21.05,15.175 21.675,14.55 33.025,14.55 34.675,12.9 34.7,12.9 34.725,12.875 34.975,12.875 35,12.9 35.025,12.9 36.575,14.45 36.6,14.5 ; C90.1@44.37,11.05 44.37,11.45 46.59,11.45 ; C92.1@46.2,14.45 v4(46.4,13.9) ; v4(46.4,11.9) C89.1@46.59,11.05 ; 47.6,11.5 47.675,11.675 48.225,12.225 48.25,12.225 48.275,12.25 48.7,12.25 49.725,13.275 49.725,13.3 49.75,13.325 49.75,13.4 49.825,13.475 50.225,15.3 ; C91.1@48.7,11.05 47.9,11.05 47.5,11.45 46.59,11.45 ; C91.1@48.925,10.95 49.525,10.325 49.675,10.175 49.7,10.175 49.725,10.15 50.575,10.15 v4@51.9,9.45 ; C89.1@46.59,11.05 46.59,11.45 ; C89.1@46.59,11.05 46.59,11.45
  Bottom Layer w0.16: v4(46.4,11.9) 46.75,11.5
  Bottom Layer w0.2: X2.20@1.27,24.13 1.27,23.05 14.525,23.05 ; C87.1@43.45,22.2 43.45,22.4 44.3,22.4 44.3,19.8 ; 43.6,15.935 43.56,18.6 44.3,19.3 44.3,19.8 ; C88.1@46.55,22.2 46.55,22.4 47.4,22.4 47.4,19.8 44.3,19.8
  Bottom Layer w0.205: 46.75,11.5 47.6,11.5
  Bottom Layer w0.3: v4(46.4,9.9) 46.25,10.3 46.25,11.3 46.59,11.45
  Bottom Layer w0.35: v4(46.4,9.9) v4(46.9,9.9)
  Bottom Layer w0.4: L3.2@9.875,15.825 U7.4@9.875,16.45 ; U7.4@10.075,16.45 10.2,16.175 10.8,15.575 10.85,15.55 10.875,15.55 10.9,15.525 11.2,15.525 11.225,15.55 11.25,15.55 11.3,15.575 14,15.825 14.025,15.85 14.05,15.85 14.1,15.875 14.275,16.05 14.3,16.1 14.3,16.125 14.325,16.15 15.375,20.55 15.375,20.575 15.4,20.6 15.4,20.625 15.425,20.65 15.425,20.95 15.4,20.975 15.4,21 15.375,21.025 15.375,21.05 14.65,21.775 14.525,22.725 14.525,23.05 ; L3.2@10.675,14.725 C84.2@11.4,14.725
  Bottom Layer w0.96: 41.5,17.3 42,17
  Bottom Layer w1.04: 40.9,17.3 41.5,17.3
  Bottom Layer w1.095: 42,17 42.8,16
  Bottom Layer w1.14: 48.3,15.935 49.6,15.935
  Bottom Layer w1.15: 49.6,15.935 50.23,15.3
  Bottom Layer w1.16: 37.85,15.85 39.6,15.85
  Bottom Layer w1.2: 43.6,15.935 48.3,15.935
  Bottom Layer w1.355: 39.6,15.85 40.9,17.3
  Bottom Layer w1.425: 36.6,14.49 37.85,15.85
  Bottom Layer w1.5: 42.8,16 43.6,15.935
VCC1V8: C82.2 C93.1 C94.1 C95.1 C96.1 C144.1 C163.1 L2.2 L7.1 R113.1 U1.C9 U1.H13 U1.J13 X2.19 | length 136.1
  Top Layer w0.15: v4(45.4,14.9) U1.C9@45.9,15.4 ; U1.H13@47.9,12.9 v4(48.4,13.4) ; C144.1@54.8,9.15 54.8,10 v4(58.3,10)
  Top Layer w0.2: U1.J13@47.9,12.4 U1.H13@47.9,12.9
  Top Layer w0.3: v4(51.95,15.75) C93.1@53,15.749
  L3-SIG w0.15: v4(43.9,14.4) 45.4,14.4 v4(45.4,14.9)
  L3-SIG w0.2: 45.4,14.4 48.4,14.4 v4(48.4,13.4) ; v3(50.5,19.4) 51.3,18.6 51.95,17 v4(51.95,15.75)
  L3-SIG w0.25: v3(8,6.45) 13.5,6.45 ; v1(12.5,12.075) 12.5,12.025 13.325,11.2 13.325,11.175 13.35,11.15 13.35,11.125 13.375,11.1 13.375,11.075 13.4,11.05 13.4,10.975 13.45,10.925 13.45,10.9 13.475,10.875 13.475,10.85 13.5,10.825 v1(13.5,5.7) ; v1(13.3,15.175) 14.95,16.825 15.3,17.5
  L3-SIG w0.3: X2.19@3.81,24.13 3.81,23.05 6.35,23.05 15.3,23.05 15.3,17.5
  L3-SIG w0.4: 44,21.75 44,16.2 45.4,15.5 v4(45.4,14.9) ; 49.95,21.75 50.5,21.2 v3(50.5,19.4)
  L3-SIG w0.6: 39.3,17.5 40.5,18.4 40.5,21.75 44,21.75 49.95,21.75
  L3-SIG w0.8: 15.3,17.5 39.3,17.5
  L4-SIG w0.25: v1(12.5,12.075) 12.3,12.275 12.3,14.475 12.325,14.5 12.325,14.525 12.35,14.55 12.35,14.575 12.375,14.6 12.375,14.625 12.475,14.725 12.5,14.725 12.525,14.75 12.55,14.75 12.575,14.775 12.6,14.775 12.625,14.8 v1(13.3,15.175)
  L4-SIG w0.4: v4(50.8,2.3) 50.8,2.9 55.7,2.9 55.7,10 ; v4(51.95,15.75) 55.7,15.75 55.7,10 ; v4(58.3,10) 55.7,10
  Bottom Layer w0.15: v4(43.9,14.4) C96.1@44.37,14.45 ; v4(48.4,13.4) 48.4,13.9 C95.1@48.81,14.45
  Bottom Layer w0.2: C94.1@49.65,22.2 49.65,22.4 50.5,22.4 v3(50.5,19.4)
  Bottom Layer w0.3: R113.1@10.9,3.9 L2.2@12,4.4 ; L2.2@12.8,4.85 C82.2@13.275,4.85 ; v4(50.8,2.3) L7.1@50.85,3.05
  other v1: 8,6.45 50.5,19.4
  other v3: 13.5,5.7
  other v5: 13.5,5.7 8,6.45 50.5,19.4
VCC3V3: BTN.1 BTN.2 C3.2 C4.2 C5.2 C6.2 C7.2 C8.2 C9.2 C11.2 C12.2 C13.2 C38.2 C80.2 C97.1 C98.1 C99.1 C100.1 C101.1 C102.1 C103.1 C104.1 C105.1 C106.1 C107.1 C108.1 C109.1 C110.1 C111.1 C112.1 C113.1 C114.1 C115.1 C116.1 C117.1 C118.1 C119.1 C120.1 C121.1 C122.1 C133.2 C134.2 C135.2 C136.2 C137.2 C138.2 C145.1 C146.1 C155.2 C156.2 C157.2 C158.2 C159.2 J1.6 J1.12 JP4.3 L4.2 L5.2 Q1.1 Q1.4 R1.3 R1.4 R2.2 R4.8 R6.2 R7.2 R19.2 R20.2 R23.1 R34.5 R34.6 R34.7 R34.8 R35.2 R80.1 R81.1 R82.1 R90.2 R91.2 R92.2 R93.2 R94.2 R96.2 R97.2 R98.2 R99.2 R107.1 R115.1 R118.1 U1.B19 U1.C14 U1.C18 U1.F17 U1.G12 U1.G13 U1.H3 U1.J7 U1.K1 U1.K7 U1.K12 U1.K13 U1.L7 U1.L12 U1.L13 U1.M7 U1.M8 U1.M12 U1.M17 U1.N7 U1.N8 U1.R1 U1.R17 U1.U13 U1.V1 U1.V6 U1.V9 U1.V11 U2.20 U2.31 U2.42 U2.50 U2.56 U3.1 U3.3 U3.9 U3.14 U3.27 U3.43 U3.49 U4.8 U8.12 U10.8 X2.18 X3.4 | length 120.6
  Top Layer w0.076: BTN.1@17.175,10.675 v2(17.275,10.675) ; C155.2@25.7,20.35 v2(25.7,20.575) ; U2.20@28.275,10.4 v5(28.275,10.925) ; v5(30.825,18.675) U2.56@30.825,18.7 ; v5(32.675,10.975) 33.35,10.775 33.625,10.5 U2.31@33.65,10.4 ; v5(32.825,16.825) 32.975,16.975 33.4,16.975 33.7,16.675 33.7,16.5 34.375,15.825 34.375,15.775 34.4,15.75 34.4,15.575 34.575,15.4 U2.42@34.625,15.4 ; U2.50@33.65,19.25 v2(33.65,19.525) v5(34,19.7) ; U2.42@34.575,15.2 U2.42@34.625,15.2 ; v4(44.15,6.9) 44.15,7.65 U1.V6@44.4,7.9 ; v4(45.65,6.9) 45.65,7.65 U1.V9@45.9,7.9 ; v4(46.65,6.9) 46.65,7.65 U1.V11@46.9,7.9 ; v4(49.65,20.3) 50.05,20.7 50.05,21.725 50.175,21.85 U4.8@50.55,21.85
  Top Layer w0.08: v4(59.42,20.34) R4.8@60.15,20.978
  Top Layer w0.15: U1.H3@42.9,12.9 v4(43.4,13.4) ; v4(47.9,14.9) U1.C14@48.4,15.4 ; v4(48.9,10.4) 49.4,10.9
  Top Layer w0.2: v4(39.52,20.84) Q1.1@40.45,20.85 ; v4(40.4,9.4) U1.R1@41.9,9.4 ; v4(40.9,7.9) U1.V1@41.9,7.9 ; v4(40.9,11.9) U1.K1@41.9,11.9 ; v4(42.14,19.88) Q1.4@42.15,20.85 ; v4(44.4,11.9) U1.K7@44.9,11.9 U1.L7@44.9,11.4 ; v4(44.4,12.4) U1.J7@44.9,12.4 ; v4(44.9,9.9) U1.N7@44.9,10.4 U1.M7@44.9,10.9 ; v4(45.4,9.9) U1.N8@45.4,10.4 U1.M8@45.4,10.9 ; U1.M12@47.4,10.9 U1.L12@47.4,11.4 U1.L13@47.9,11.4 U1.K13@47.9,11.9 ; U1.K12@47.4,11.9 U1.K13@47.9,11.9 ; U1.G12@47.4,13.4 v4(47.4,13.9) ; U1.U13@47.9,8.4 v4(47.9,8.9) ; U1.G13@47.9,13.4 v4(47.9,13.9) ; v4(48.4,11.9) U1.K13@47.9,11.9 ; v4(49.4,9.4) U1.R17@49.9,9.4 ; 49.4,10.9 U1.M17@49.9,10.9 ; v4(49.4,13.9) U1.F17@49.9,13.9 ; U1.C18@50.4,15.4 U1.B19@50.9,15.9 v4(51.4,15.9) ; C97.1@54.8,15.749 C98.1@56.6,15.749 v4(57.675,15.749) ; C145.1@56.6,9.15 v4(57.62,9.14)
  Top Layer w0.3: v4(17.675,16.2) C158.2@18.1,16.35 ; v4(22.575,7.5) C159.2@23,7.5 ; C157.2@38.75,18 v4(38.825,18.425) ; v4(51.95,12.45) C146.1@53,12.45
  Bottom Layer w0.2: v4(7.62,21.38) C12.2@8.25,21.39 ; v4(9.92,21.38) R35.2@10.55,21.39 ; U3.27@17.95,6.17 v4(16.95,6) C9.2@19.05,4.25 ; v4(19.34,2.32) L4.2@19.45,3.05 ; L5.2@22.25,3.05 v4(22.64,2.12) C133.2@22.75,3.95 ; v4(23.94,2.32) C134.2@23.95,3.95 ; C135.2@25.15,3.95 25.15,4.85 26.35,4.85 ; C136.2@26.35,3.95 26.35,4.85 ; C3.2@26.95,3.05 v3(27.93,4.85) ; C137.2@27.55,3.95 v3(27.93,4.85) ; U3.14@28.35,6.17 v3(27.93,4.85) ; C138.2@28.75,3.95 C4.2@29.25,3.05 ; C138.2@28.75,3.95 v3(28.8,4.4) ; U3.43@29.95,17.53 v3(30.3,16.4) ; C5.2@31.55,3.05 v4(32.175,1.025) ; U3.9@32.35,6.17 v3(32.35,7) ; v4(32.625,1) C38.2@33.549,3.95 ; U3.49@34.75,17.53 v3@35.065,16.82 ; v3(36.143,2.4) C7.2@36.15,3.05 ; U3.3@37.15,6.17 v4(37.2,7.04) ; v4(38.44,3.78) C8.2@38.45,3.05 ; U3.1@38.75,6.17 v4(39.75,6.45) ; C100.1@40.35,21.1 v4(39.4,21.75) 40.35,22.4 C106.1@40.35,22.2 ; v4(40.9,11.9) C108.1@42.15,11.05 ; C120.1@42.15,17.85 v4(42.14,19.88) C101.1@43.45,21.1 ; 42.4,8.4 43.2,8.2 44.37,8.2 46.59,8.2 C107.1@46.59,7.65 v4(46.65,6.9) ; C117.1@44.37,17.85 v4(44.875,19.05) ; C102.1@46.55,21.1 v4(46.55,20.25) ; C116.1@46.59,17.85 v4(46.59,19.4) ; v4(47.9,8.9) C110.1@48.81,7.65 ; v4(48.38,17.84) C118.1@48.81,17.85 ; C115.1@51.03,7.65 v4(51.42,6.54) 52.3,7.65 C122.1@53.25,7.65 ; C111.1@51.03,11.05 51.03,11.85 v4(51.85,11.85) ; C114.1@51.03,14.45 51.03,15.9 v4(51.4,15.9) ; v4(52.575,4.625) R20.2@52.95,3.95 ; C104.1@52.749,21.1 v4(53.54,21.74) 52.749,22.4 C99.1@52.749,22.2 ; C119.1@53.25,11.05 52.6,11.05 v4(51.95,12.45) 53.25,13.2 C121.1@53.25,14.45 ; v4(54.74,4.62) R23.1@54.75,3.95 ; R2.2@56.049,22.05 v4(56.7,21.1) ; v4(57.24,22.48) R6.2@57.249,22.05 ; R1.4@57.8,3.15 57.8,2.85 v4(58.2,3.5) 58.6,2.85 R1.3@58.6,3.15 ; v4(59.34,16.58) R91.2@59.35,17.01 ; R94.2@59.35,19.85 v4(59.42,20.34) ; R92.2@61.4,17.01 v4(61.82,17) ; R99.2@61.4,19.85 v4(61.82,19.84) ; v4(63.44,13.74) R90.2@63.45,14.17 ; v4(63.44,16.58) R93.2@63.45,17.01 ; 26.35,4.85 v3(27.93,4.85)
  Bottom Layer w0.23: U3.43@29.95,17.53 29.95,18.365 31.2,18.365 ; 33.5,18.365 34.75,18.365 U3.49@34.75,17.53
  Bottom Layer w0.24: C113.1@42.15,7.65 42.4,8.4
  Bottom Layer w0.25: v4(40.85,15.6) 40.85,14.9 41.4,14.9 41.9,14.7 C112.1@42.15,14.45
  Bottom Layer w0.29: 31.2,18.365 R81.1@31.2,19.05 ; 33.5,18.365 R82.1@33.5,19.05
  Bottom Layer w0.3: v3@28.925,20.375 C156.2@29.25,20 ; v3(29,20.275) v3@29.007,20.281 ; C109.1@44.37,7.65 44.37,8.2 ; v4(49.65,20.3) C103.1@49.65,21.1 ; C105.1@55.849,21.1 v4(56.7,21.1) ; R7.2@58.449,22.05 v4(58.45,22.55)
  other v1: 17.275,10.675 28.275,10.925 32.675,10.975 13.45,12.1 16.675,14.575 32.825,16.825 30.825,18.675 34,19.7 25.7,20.575
  other v2: 28.275,10.925 32.675,10.975 13.45,12.1 16.675,14.575 32.825,16.825 30.825,18.675 34,19.7
  other v3: 11.25,8.8 12.8,10.7 15.025,12.7 8.9,12.85 4.25,14.275 35.075,16.825 10.825,18.05 12.025,18.05 12.825,18.05 13.225,18.05 19.3,18.65 28.625,18.7 25.575,19.075 18.05,19.25 19.25,19.45 19.475,20 3.025,21.05 5.675,21.05
  other v5: 17.275,10.675 13.45,12.1 16.675,14.575 25.7,20.575
  other v6: 17.275,10.675 28.275,10.925 32.675,10.975 13.45,12.1 16.675,14.575 32.825,16.825 30.825,18.675 34,19.7 25.7,20.575
VCCADC: C123.1 C124.1 L7.2 U1.C13 | length 24.5
  Top Layer w0.15: v4(47.4,14.9) U1.C13@47.9,15.4
  L3-SIG w0.2: v4(47.8,5.25) 47.8,3.9 53.34,3.9 v4(53.34,2.3)
  L4-SIG w0.2: v4(47.4,14.9) 47.4,14.47 47.03,14.1 47.03,12.97 48,12 48,11.13 48.53,10.6 48.53,8.35 48.63,8.25 48.63,5.42 48.8,5.25 48.8,4.85 48.55,4.6 47.8,4.6 v4(47.8,5.25)
  Bottom Layer w0.3: v4(47.4,14.9) C123.1@47.45,14.45 ; v4(47.8,5.25) C124.1@47.95,4.25 ; L7.2@52.45,3.05 v4(53.34,2.3)
VU: C78.2 C147.2 C148.2 C149.2 C160.2 C167.2 L8.2 R108.1 U7.1 U7.3 U8.1 U8.5 U8.11 U8.18 U8.24 U8.28 X2.22 | length 92.3
  Top Layer w0.2: v4(16.05,4.975) 33.95,5.7 34.175,5.925 34.2,5.925 34.225,5.95 34.5,5.95 36.525,3.925 36.525,3.85 36.55,3.825 36.55,3.8 36.575,3.75 36.85,3.475 36.9,3.45 36.925,3.45 36.95,3.425 37.1,3.4 37.275,3.375 42.825,2.95 42.85,2.95 42.875,2.925 46.4,2.85 46.425,2.85 46.45,2.825 49.925,2.85 50.175,2.875 50.45,2.9 50.7,2.925 55.175,2.95 55.2,2.95 55.225,2.975 55.475,2.975 55.5,2.95 55.525,2.95 X2.22@56.75,1.725
  Top Layer w0.4: v4(5.325,9.425) 6.1,10.2 v4(6.125,10.2) ; v4(7.025,11.175) 7.4,11.175 7.675,11.175 7.7,11.2 7.725,11.2 7.75,11.225 7.775,11.225 8.2,11.65 v4(8.475,11.675) ; v2(9.2,5.75) v4(10.9,5.75) ; v2(9.4,7.45) 11.225,9.275 v2(11.925,9.3) ; v2(9.4,11.15) 9.925,11.15 9.95,11.175 9.975,11.175 10,11.2 10.025,11.2 10.475,11.65 v4(11.075,11.65) ; v4(11.925,10.825) v2(11.925,9.3) ; v4(12.875,9.05) v2(11.925,9.3) ; v4@16.05,4.95 v4(16.05,4.975) v4@16.05,4.95
  Bottom Layer w0.2: v4(7.025,11.175) U8.1@7.4,11.175
  Bottom Layer w0.4: R108.1@1.7,13.125 1.7,9.95 1.725,9.925 1.725,9.9 1.75,9.875 1.75,9.85 1.85,9.75 1.85,9.625 C147.2@2.2,9.275 ; C78.2@1.75,8.425 C147.2@2.2,8.425 ; C147.2@3,8.425 L8.2@3.55,8.425 ; v4(5.325,9.425) 5.325,9.4 5.475,9.25 5.475,9.225 5.65,9.05 5.65,9.025 6.05,8.625 6.05,8.6 6.075,8.55 6.175,8.45 6.2,8.45 6.225,8.425 6.25,8.425 6.275,8.4 U8.24@6.425,8.4 ; L8.2@5.35,8.3 U8.24@6.425,8.3 ; v4(6.125,10.2) 6.175,10.25 6.2,10.25 6.225,10.275 6.25,10.275 6.275,10.3 6.7,10.3 7.1,10.7 ; U8.28@6.95,10.425 6.95,10.5 6.975,10.55 7,10.575 7,10.6 7.1,10.7 ; C149.2@7.3,18.95 U7.1@7.725,18.95 ; U7.1@8.175,19.8 8.3,20.075 8.425,20.2 8.45,20.2 8.475,20.225 8.5,20.225 8.525,20.25 9.275,20.25 9.3,20.225 9.325,20.225 9.35,20.2 9.375,20.2 9.475,20.1 9.5,20.05 9.5,20.025 9.525,20 U7.3@9.625,19.8 ; v4(8.475,11.675) C167.2@8.825,11.7 ; C167.2@8.825,12.375 8.725,12.375 8.65,12.425 8.45,12.625 8.45,12.675 8.425,12.7 8.425,13.3 8.725,13.6 8.75,13.65 8.75,13.675 8.775,13.7 9.325,18.3 9.5,18.65 U7.3@9.625,18.95 ; C160.2@9.15,5.65 v2(9.2,5.75) ; C167.2@9.275,11.7 9.275,11.5 9.3,11.475 U8.5@9.3,11.275 ; v4(10.9,5.75) 10.9,6.175 12.95,8.225 13,8.25 13.025,8.25 13.05,8.275 15.5,8.275 ; v4(11.075,11.65) 11.1,11.675 C148.2@11.475,11.675 ; v4(11.925,10.825) C148.2@11.925,11.675 ; v4(12.875,9.05) 13.425,8.5 15.5,8.275 ; 7.1,10.7 7.15,10.725 ; 7.1,10.7 7.15,10.725 ; 7.15,10.725 7.2,10.75 ; 7.15,10.725 7.2,10.75 ; 7.2,10.75 7.25,10.75 7.2,10.75 ; U8.11@11.775,9.3 v2(11.925,9.3) ; U8.11@11.775,9.3 v2(11.925,9.3) ; U8.11@11.775,9.3 v2(11.925,9.3) ; 15.5,8.275 15.525,8.25 ; 15.5,8.275 15.525,8.25 ; 15.525,8.25 15.55,8.25 ; 15.525,8.25 15.55,8.25 ; 15.55,8.25 15.6,8.225 ; 15.55,8.25 15.6,8.225 ; 15.6,8.225 15.7,8.125 ; 15.6,8.225 15.7,8.125 ; 15.7,8.1 15.7,8.125 ; 15.7,8.1 15.725,8.075 ; 15.7,8.1 15.7,8.125 ; 15.7,8.1 15.725,8.075 ; 15.725,8.05 15.725,8.075 ; 15.725,8.05 15.75,8.025 ; 15.725,8.05 15.725,8.075 ; 15.725,8.05 15.75,8.025 ; 15.75,8.025 v4(16.05,4.975) 15.75,8.025
  other v1: 9.2,5.75 9.4,7.45 11.925,9.3 9.4,11.15
  other v3: 9.2,5.75 9.4,7.45 11.925,9.3 9.4,11.15
  other v5: 9.2,5.75 9.4,7.45 11.925,9.3 9.4,11.15
  other v6: 9.2,5.75 9.4,7.45 11.925,9.3 9.4,11.15
WE#: U1.V4 U3.16 | length 20.6
  Top Layer w0.076: v4(41.9,4.4) 43.15,6.55 43.15,7.187 43.15,7.65 U1.V4@43.4,7.9
  L3-SIG w0.1: v5(27.125,6.95) v1@27.15,6.95
  L3-SIG w0.125: v1@27.15,6.975 27.15,6.725 28.35,5.525 38.625,5 39.95,4.725 40.175,4.525 41.55,4.3 v4(41.9,4.4)
  Bottom Layer w0.1: v3@27.135,6.945 v5(27.125,6.95) 27.15,6.95 v3@27.14,6.955
  Bottom Layer w0.125: U3.16@26.75,6.17 v3@27.15,6.975
  other v1: 27.125,6.95
  other v3: 27.125,6.95
pads on no net: U1.A2 U1.A8 U1.A10 U1.B2 U1.B8 U1.B10 U1.D1 U1.D2 U2.3 U2.23 U2.24 U2.26 U2.27 U2.28 U2.29 U2.30 U2.32 U2.33 U2.34 U2.36 U2.44 U2.45 U2.46 U2.48 U2.52 U2.53 U2.54 U2.55 U2.57 U2.58 U2.59 U3.40 U8.22 U10.6 U10.7 X1.4 X3.A X3.B X4.MP1 X4.MP2

## Polygon pours and split planes (outlines as drawn)
GND on L2-GND "L2_GND_PLANE" (solid, remove dead copper, pour order 0): 0.25,0.25 69.6,0.25 69.6,25.15 0.25,25.15
VCC3V3 on L5-VCC3V3 "L5_VCC3V3_PLANE" (solid, remove dead copper, pour order 1): 0.25,0.25 69.6,0.25 69.6,25.15 0.25,25.15

## Silkscreen, mask and mechanical layers (free items; w line width, h text height)
Top Overlay:
  text "1V0" at 0.33,22.189 h0.8
  text "1V8" at 2.87,22.189 h0.8
  text "3V3" at 5.41,22.189 h0.8
  text "GND" at 7.95,22.189 h0.8
  text "C13" at 10.49,22.189 h0.8
  text "C12" at 13.03,22.189 h0.8
  text "C11" at 15.57,22.189 h0.8
  text "C10" at 18.11,22.189 h0.8
  text "C9" at 21.05,22.189 h0.8
  text "C8" at 23.59,22.189 h0.8
  text "C7" at 36.29,22.189 h0.8
  text "C0" at 53.943,22.189 h0.8
  text "CLK" at 57.55,20.855 h0.8 r90
  text "U4" at 52.6,19.4 h0.8
  text "R4" at 58.633,13.85 h0.8
  text "U1" at 45.867,5.63 h0.8
  text "ZULU A7 2.2" at 37.7,3.77 h1.3
  text "AI1" at 0.33,2.411 h0.8
  text "AI0" at 2.87,2.411 h0.8
  text "C28" at 5.41,2.411 h0.8
  text "C27" at 7.95,2.411 h0.8
  text "C26" at 10.49,2.411 h0.8
  text "C25" at 13.03,2.411 h0.8
  text "C24" at 15.57,2.411 h0.8
  text "C23" at 18.11,2.411 h0.8
  text "C22" at 20.65,2.411 h0.8
  text "C21" at 23.19,2.411 h0.8
  text "C20" at 37.23,2.411 h0.8 r90
  text "C19" at 38.303,2.411 h0.8
  text "C18" at 40.843,2.411 h0.8
  text "C17" at 43.383,2.411 h0.8
  text "C16" at 45.923,2.411 h0.8
  text "C15" at 48.463,2.411 h0.8
  text "C14" at 51.003,2.411 h0.8
  text "RST" at 53.543,2.411 h0.8
  text "VU" at 56.483,2.411 h0.8
  text "GND" at 60.09,2.411 h0.8 r90
Mechanical 1:
  the board outline again, w0.1

## Text inside footprints (layer, text, board x,y; h text height)
U$2: Mechanical 3 "CC" at 3.027,-7.711 h3.94
U$3: Mechanical 3 "BY" at 9.371,-13.056 h2.76
U$4: Mechanical 3 "SA" at 13.927,-13.056 h2.76
U$5: Mechanical 3 "C" at 19.916,-8.371 h5.91